# Altium PCB PCB.PcbDoc (part 1 of 2)
Units mm, origin at the board's own origin, x right, y up, seen from the top; angles counter-clockwise.
Board outline 100 x 70 mm, 4 copper layers (Top, Middle_1, Middle 2, Bot), stack 1.541 mm thick; 204 components, 143 nets, 825 pads, 208 vias.
Unrouted connection lines stored in the file: 379.
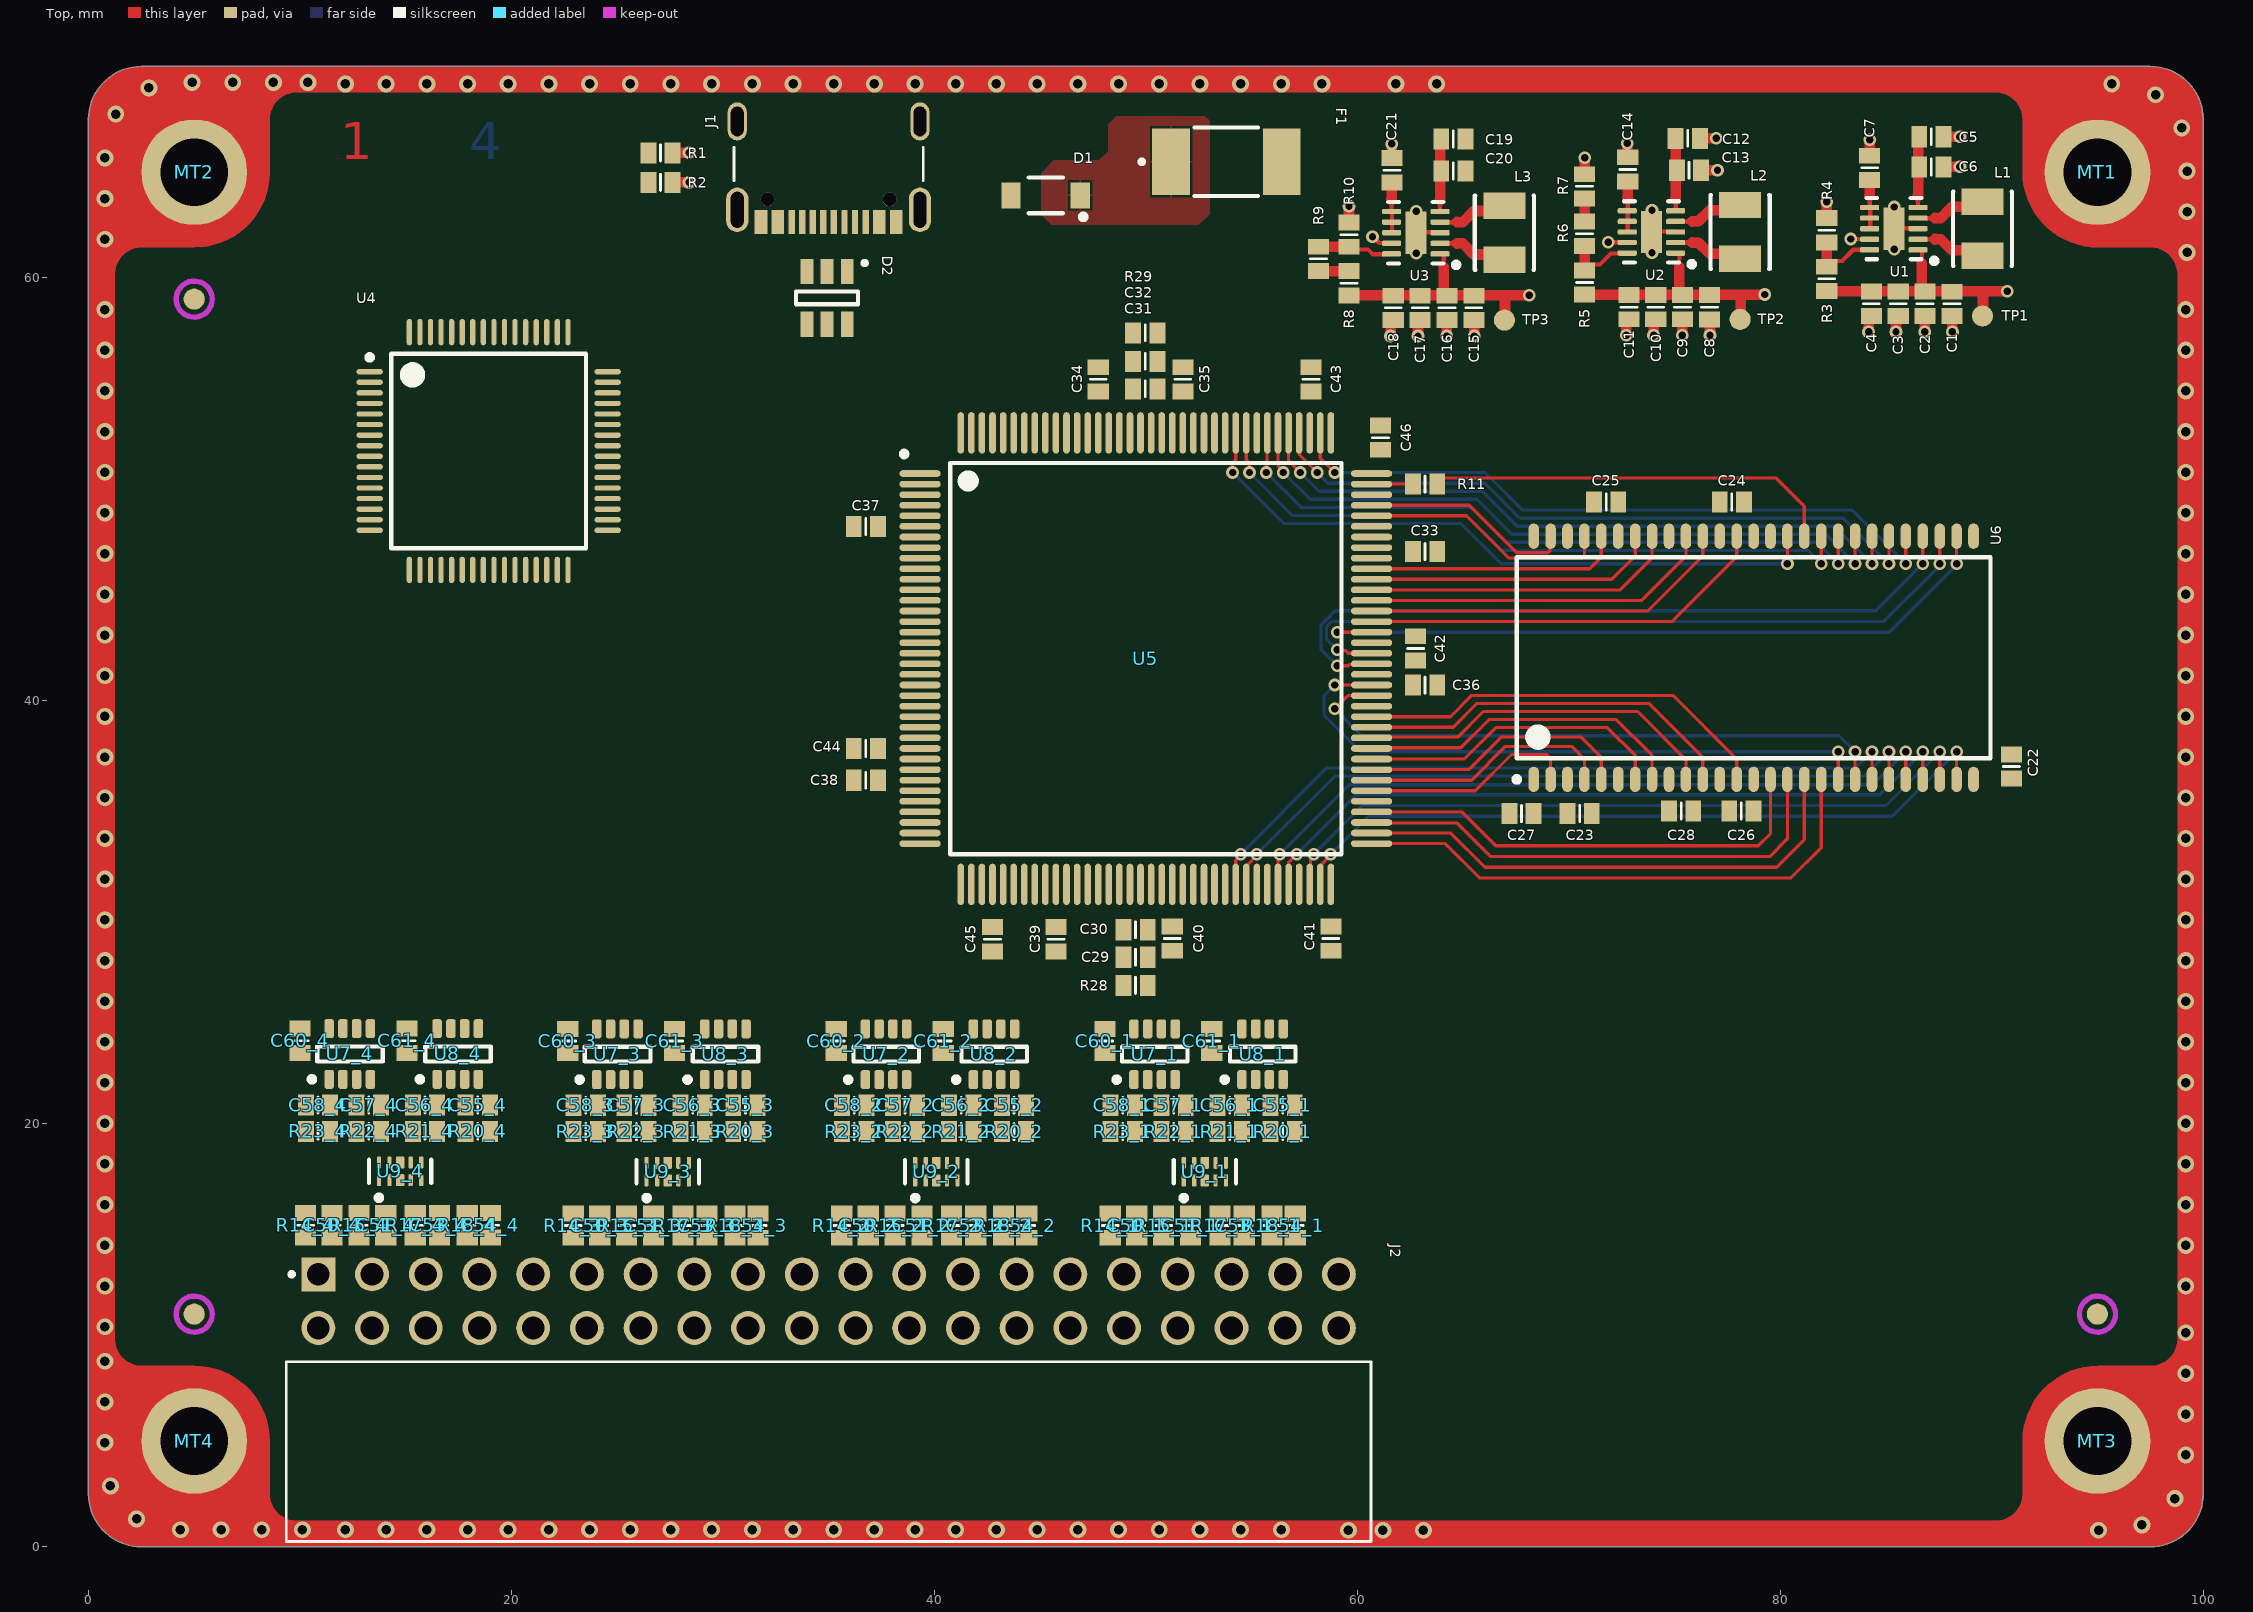
[diagram p0: Top view]
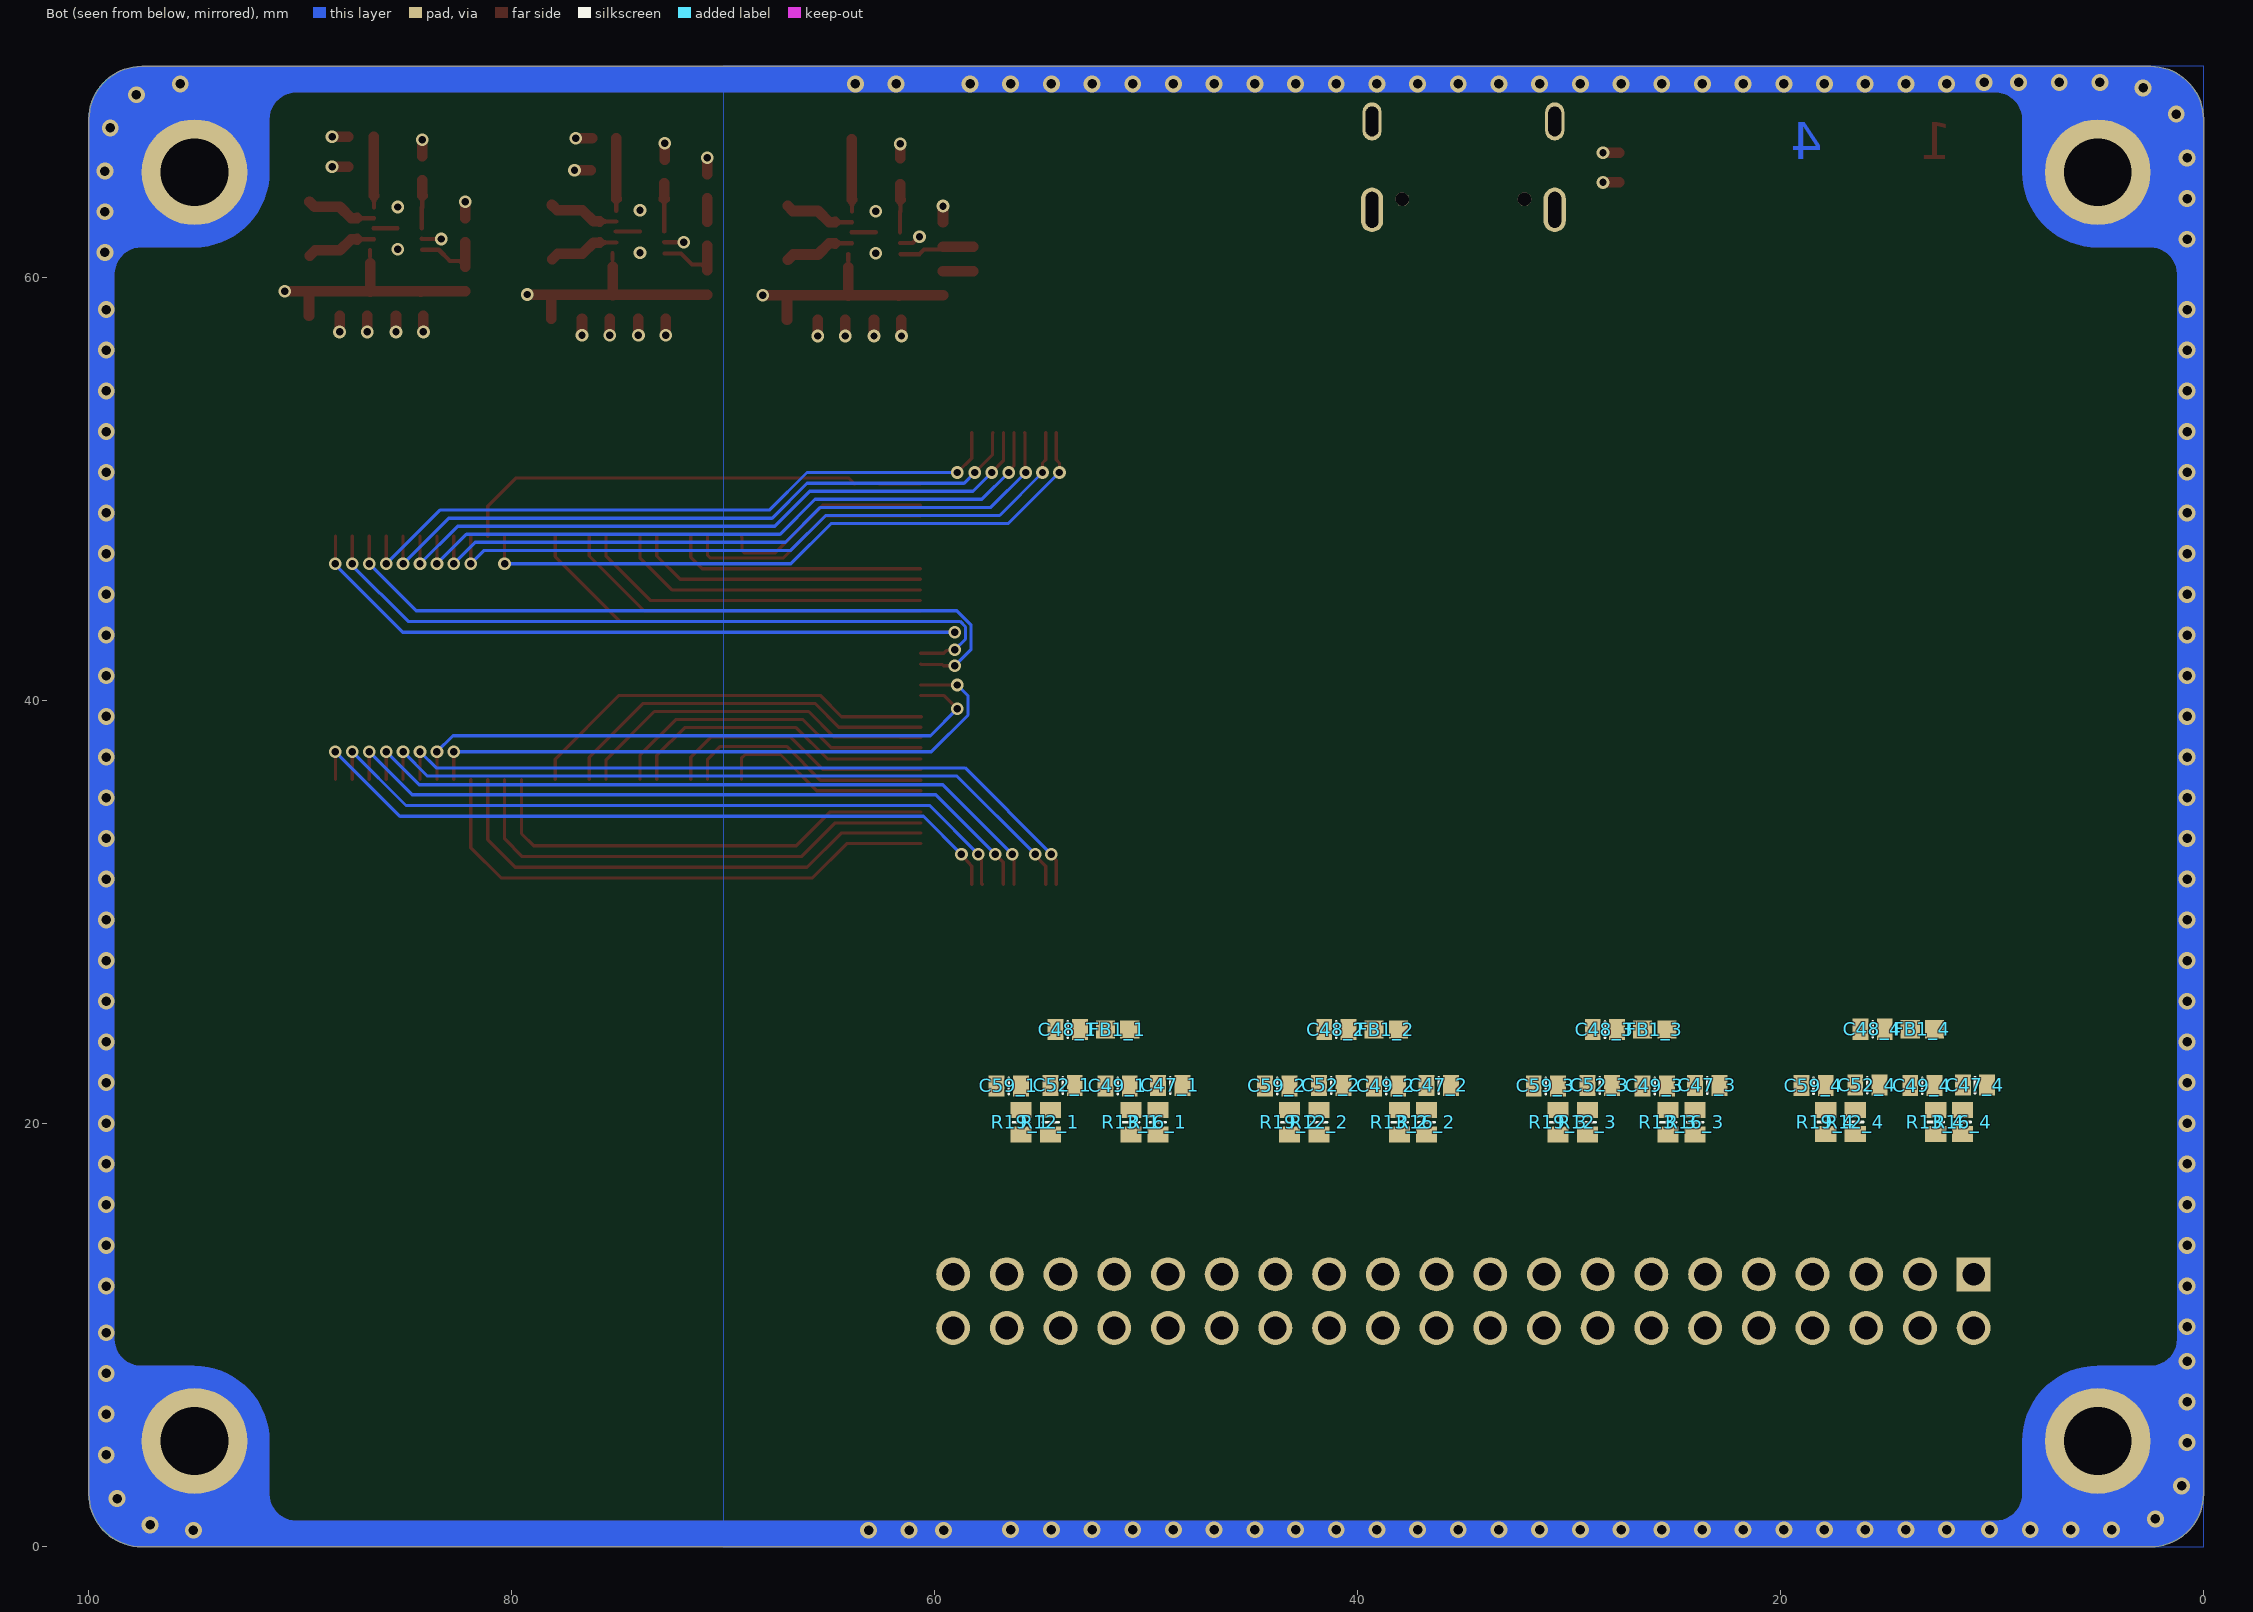
[diagram p1: Bot view, seen from below]
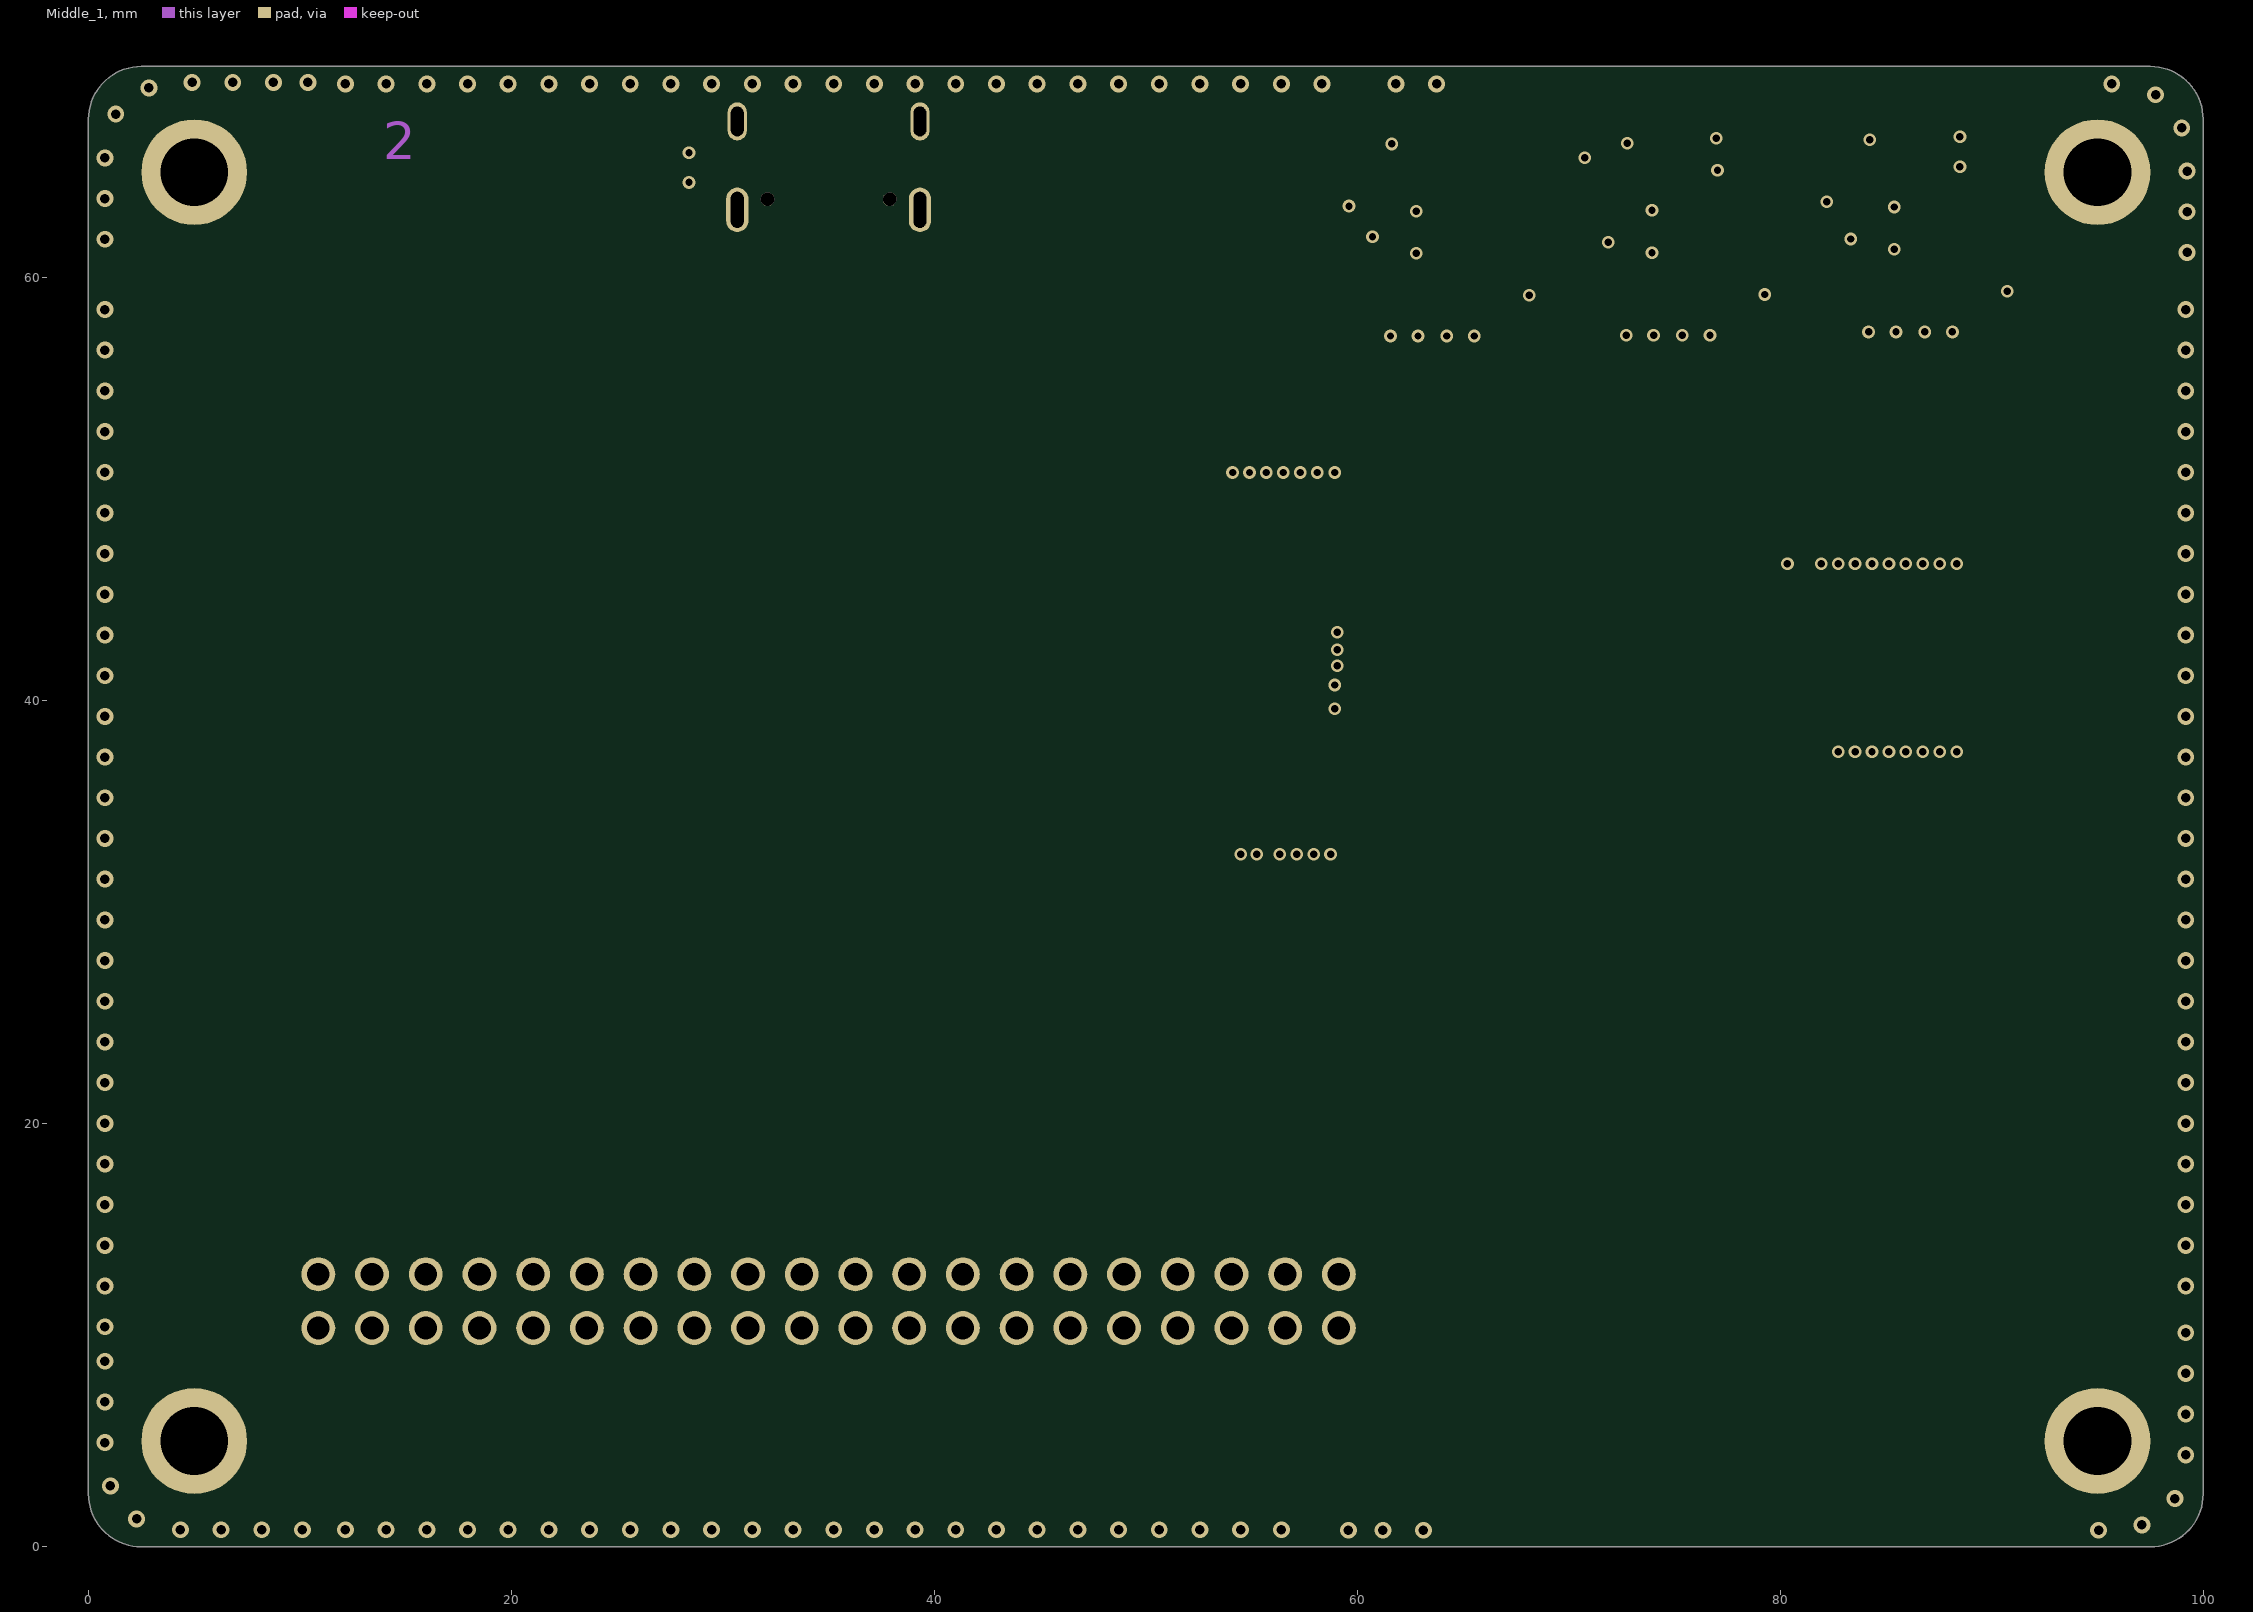
[diagram p2: Middle_1]
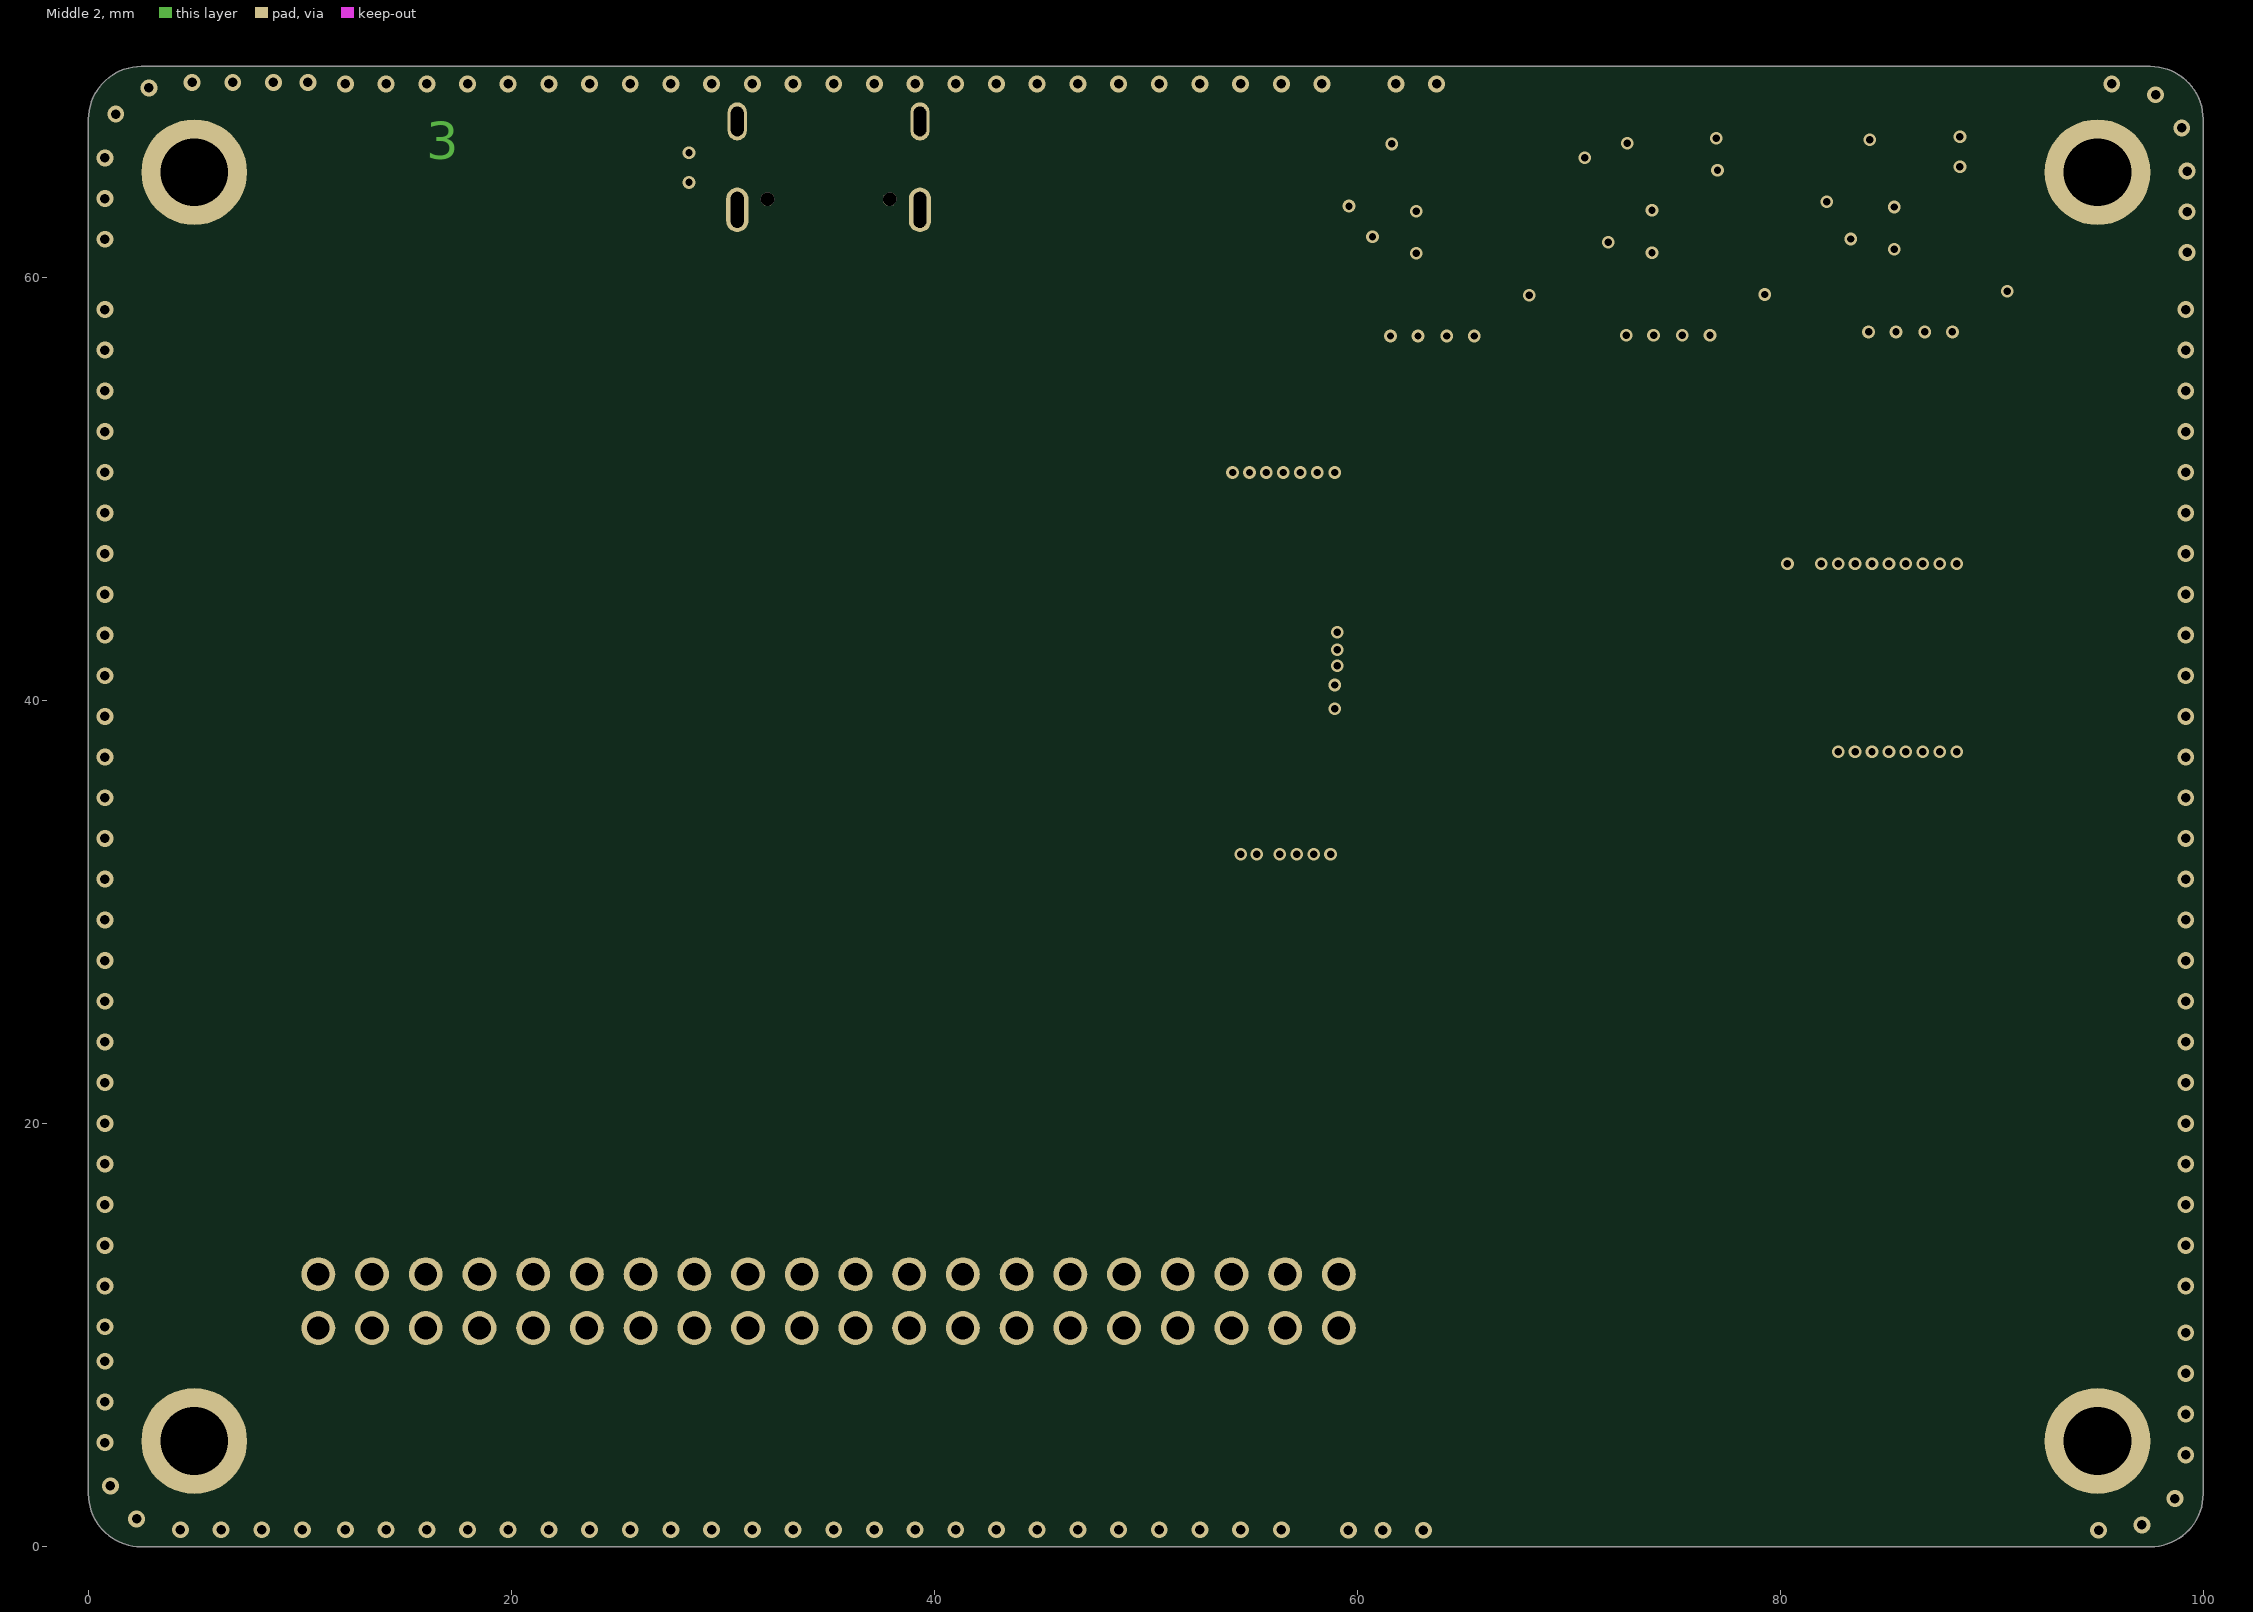
[diagram p3: Middle 2]

## Layer stack, top to bottom
Top Solder: solder mask 0.0127, Solder Resist, Dk 3.8
Top: signal copper 0.035
Dielectric 1: prepreg 0.1855, 7628, Dk 4.74
Middle_1: signal copper 0.035
Core: core 1.03, FR-4, Dk 4.6
Middle 2: signal copper 0.035
Dielectric 2: prepreg 0.1855, 7628, Dk 4.74
Bot: signal copper 0.035
Bottom Solder: solder mask 0.0127, Solder Resist, Dk 3.8

## Board outline
2.5,0 cw(c2.5,2.5) 0,2.5 0,67.5 cw(c2.5,67.5) 2.5,70 97.5,70 cw(c97.5,67.5) 100,67.5 100,2.5 cw(c97.5,2.5) 97.5,0

## Design rules (kind name [scope] priority, off if disabled: settings)
BoardOutlineClearance [All] p1: gap=0.2 ignorepadtopadclearanceinfootprint=FALSE
Clearance [All] p1: gap=0.102 ignorepadtopadclearanceinfootprint=FALSE except(0.1: SMDPad-Hole; 0.127: Arc-Via Track-Via SMDPad-Via THPad-Via Via-Via Via-Fill Via-Poly Via-Region Via-Text; 0.25: Arc-Hole Track-Hole THPad-Hole Via-Hole Fill-Hole Poly-Hole Region-Hole Text-Hole)
ComponentClearance [All] p1: gap=0.102 collisioncheckmode=3 verticalgap=0.102 showdistances=TRUE
DiffPairsRouting DiffPairsRouting_USB [InDifferentialPairClass('USB')] p1: maxlimit=0.254 minlimit=0.127 mostfreqgap=0.254 toplayer_maxgap=0.127 toplayer_prefgap=0.127 toplayer_minwidth=0.178 toplayer_maxwidth=0.178 toplayer_prefwidth=0.178 impedanceprofiledriven=TRUE impedanceprofileid={492B9CAE-2537-4936-96EE-43986F0FA2F4} impedanceprofilevalue=90.000000 maxuncoupledlength=12.7
DiffPairsRouting DiffPairsRouting_CAN [InDifferentialPairClass('CAN_BUS')] p2: maxlimit=0.254 minlimit=0.127 mostfreqgap=0.254 toplayer_maxgap=0.127 toplayer_prefgap=0.127 toplayer_minwidth=0.461 toplayer_maxwidth=0.461 toplayer_prefwidth=0.461 impedanceprofiledriven=TRUE impedanceprofileid={806E55BA-9264-46BE-8866-E8A3E6802D65} impedanceprofilevalue=60.000000 maxuncoupledlength=12.7
DiffPairsRouting [All] p3: maxlimit=0.102 minlimit=0.102 mostfreqgap=0.102 toplayer_minwidth=0.127 toplayer_maxwidth=1816.048 toplayer_prefwidth=0.2 midlayer1_minwidth=0.127 midlayer1_maxwidth=1816.048 midlayer1_prefwidth=0.2 midlayer2_minwidth=0.127 midlayer2_maxwidth=1816.048 midlayer2_prefwidth=0.2 bottomlayer_minwidth=0.127 bottomlayer_maxwidth=1816.048 bottomlayer_prefwidth=0.2 maxuncoupledlength=12.7
Height [All] p1: minheight=0 maxheight=1816.048 prefheight=12.7
HoleSize [All] p1: absolutevalues=TRUE maxlimit=6.3 minlimit=0.2 maxpercent=80.000 minpercent=20.000
HoleToHoleClearance [All] p1: gap=0.25 allowstackedmicrovias=FALSE
MinimumAnnularRing [All] p1: minimumring=0.076
MinimumSolderMaskSliver [All] p1: minsoldermaskwidth=0.22
PlaneClearance [All] p1: clearance=0.102
PlaneConnect PlaneConnectPowerPads [InPadClass('PowerPads')] p1: planeconnectstyle=Direct reliefexpansion=0.508 reliefentries=4 reliefconductorwidth=0.254 reliefairgap=0.254
PlaneConnect [All] p2: pad.planeconnectstyle=Relief pad.reliefexpansion=0.3 pad.reliefentries=4 pad.reliefconductorwidth=0.102 pad.reliefairgap=0.102 via.planeconnectstyle=Direct via.reliefexpansion=0.3 via.reliefentries=4 via.reliefconductorwidth=0.127 via.reliefairgap=0.127
PolygonConnect "Schematic Polygon Connect Style_7" [InComponent('MT1')] p1: connectstyle=Direct reliefconductorwidth=0.254 reliefentries=4 polygonreliefangle="90 Angle" airgapwidth=0.254
PolygonConnect "Schematic Polygon Connect Style_6" [InComponent('MT4')] p2: connectstyle=Direct reliefconductorwidth=0.254 reliefentries=4 polygonreliefangle="90 Angle" airgapwidth=0.254
PolygonConnect "Schematic Polygon Connect Style_5" [InComponent('MT2')] p3: connectstyle=Direct reliefconductorwidth=0.254 reliefentries=4 polygonreliefangle="90 Angle" airgapwidth=0.254
PolygonConnect "Schematic Polygon Connect Style_4" [InComponent('MT3')] p4: connectstyle=Direct reliefconductorwidth=0.254 reliefentries=4 polygonreliefangle="90 Angle" airgapwidth=0.254
PolygonConnect PolygonConnect_MOUNTING_PADS [InComponentClass('MOUNTING_PADS')] p5: connectstyle=Direct reliefconductorwidth=0.254 reliefentries=4 polygonreliefangle="90 Angle" airgapwidth=0.254
PolygonConnect [All] p6: thpad.connectstyle=Relief thpad.reliefconductorwidth=0.102 thpad.reliefentries=4 thpad.polygonreliefangle="90 Angle" thpad.airgapwidth=0.102 smdpad.connectstyle=Relief smdpad.reliefconductorwidth=0.102 smdpad.reliefentries=4 smdpad.polygonreliefangle="90 Angle" smdpad.airgapwidth=0.102 via.connectstyle=Direct via.reliefconductorwidth=0.102 via.reliefentries=4 via.polygonreliefangle="90 Angle" via.airgapwidth=0.102
RoutingVias [All] p1: holewidth=0.2 width=0.45 viastyle="Through Hole" minholewidth=0.2 minwidth=0.45 maxholewidth=6.3 maxwidth=6.55
SilkToSilkClearance [All] p1: silktosilkclearance=0
SilkToSolderMaskClearance [IsPad] p1: minsilkscreentomaskgap=0.102 clearancetoexposedcopper=TRUE
SolderMaskExpansion Via_SolderMaskExpansion [IsVia] p1: expansion=0.075 istentingtop=TRUE
SolderMaskExpansion [All] p2: expansion=0 istentingtop=FALSE
SupplyNets "Schematic Supply Nets_12" [InNet('3V3A_2')] p1: voltage=0.000
SupplyNets "Schematic Supply Nets_11" [InNet('3V3A_1')] p2: voltage=0.000
SupplyNets "Schematic Supply Nets_10" [InNet('3V3A_4')] p3: voltage=0.000
SupplyNets "Schematic Supply Nets_9" [InNet('GND_PLL1')] p4: voltage=0.000
SupplyNets "Schematic Supply Nets_8" [InNet('3V3A_3')] p5: voltage=0.000
SupplyNets "Schematic Supply Nets_7" [InNet('GND_PLL0')] p6: voltage=0.000
SupplyNets "Schematic Supply Nets" [InNet('USB1_VBUS_FUSE')] p7: voltage=0.000
SupplyNets "Schematic Supply Nets_6" [InNet('VIN_5V0')] p8: voltage=0.000
SupplyNets "Schematic Supply Nets_5" [InNet('1V2')] p9: voltage=0.000
SupplyNets "Schematic Supply Nets_4" [InNet('3V3')] p10: voltage=0.000
SupplyNets "Schematic Supply Nets_3" [InNet('2V5')] p11: voltage=0.000
SupplyNets "Schematic Supply Nets_2" [InNet('GND')] p12: voltage=0.000
SupplyNets "Schematic Supply Nets_1" [InNet('USB1_VBUS')] p13: voltage=0.000
Width "50 Ohms" [InNetClass('50 Ohms')] p1: maxlimit=0.172 minlimit=0.137 preferedwidth=0.172 toplayer_minwidth=0.172 bottomlayer_minwidth=0.172 minimp=50.000000 maximp=50.000000 favimp=50.000000
Width Minimal [Not InAnyDifferentialPair] p2: maxlimit=1816.048 minlimit=0.152 preferedwidth=0.2 midlayer1_minwidth=0.2 midlayer2_minwidth=0.2 minimp=50.000000 maximp=50.000000 favimp=50.000000
20 further rules are at their usual default settings.

## Classes and differential pairs
net class SDRAM_DATA: SDRAM_DQ0 SDRAM_DQ1 SDRAM_DQ2 SDRAM_DQ3 SDRAM_DQ4 SDRAM_DQ5 SDRAM_DQ6 SDRAM_DQ7 SDRAM_DQ8 SDRAM_DQ9 SDRAM_DQ10 SDRAM_DQ11 SDRAM_DQ12 SDRAM_DQ13 SDRAM_DQ14 SDRAM_DQ15
channel class Input_Comparator_Frontend: U_Input_Frontend1 U_Input_Frontend2 U_Input_Frontend3 U_Input_Frontend4
component class U_Input_Frontend4: C47_4 C48_4 C49_4 C50_4 C51_4 C52_4 C53_4 C54_4 C55_4 C56_4 C57_4 C58_4 C59_4 C60_4 C61_4 FB1_4 R12_4 R13_4 R14_4 R15_4 R16_4 R17_4 R18_4 R19_4 R20_4 R21_4 R22_4 R23_4 U7_4 U8_4 U9_4
component class U_Input_Frontend3: C47_3 C48_3 C49_3 C50_3 C51_3 C52_3 C53_3 C54_3 C55_3 C56_3 C57_3 C58_3 C59_3 C60_3 C61_3 FB1_3 R12_3 R13_3 R14_3 R15_3 R16_3 R17_3 R18_3 R19_3 R20_3 R21_3 R22_3 R23_3 U7_3 U8_3 U9_3
component class U_Input_Frontend2: C47_2 C48_2 C49_2 C50_2 C51_2 C52_2 C53_2 C54_2 C55_2 C56_2 C57_2 C58_2 C59_2 C60_2 C61_2 FB1_2 R12_2 R13_2 R14_2 R15_2 R16_2 R17_2 R18_2 R19_2 R20_2 R21_2 R22_2 R23_2 U7_2 U8_2 U9_2
component class U_Input_Frontend1: C47_1 C48_1 C49_1 C50_1 C51_1 C52_1 C53_1 C54_1 C55_1 C56_1 C57_1 C58_1 C59_1 C60_1 C61_1 FB1_1 R12_1 R13_1 R14_1 R15_1 R16_1 R17_1 R18_1 R19_1 R20_1 R21_1 R22_1 R23_1 U7_1 U8_1 U9_1
net class SDRAM_ADDR: SDRAM_#CAS SDRAM_#CS SDRAM_#RAS SDRAM_#WE SDRAM_ADDR0 SDRAM_ADDR1 SDRAM_ADDR2 SDRAM_ADDR3 SDRAM_ADDR4 SDRAM_ADDR5 SDRAM_ADDR6 SDRAM_ADDR7 SDRAM_ADDR8 SDRAM_ADDR9 SDRAM_ADDR10 SDRAM_ADDR11 SDRAM_ADDR12 SDRAM_ADDR13 SDRAM_ADDR14 SDRAM_ADDR15 SDRAM_BS0 SDRAM_BS1 SDRAM_CKE SDRAM_CLK SDRAM_CLK_TERM SDRAM_LDQM SDRAM_UDQM
net class SDRAM_DQ[0..15]: SDRAM_DQ0 SDRAM_DQ1 SDRAM_DQ2 SDRAM_DQ3 SDRAM_DQ4 SDRAM_DQ5 SDRAM_DQ6 SDRAM_DQ7 SDRAM_DQ8 SDRAM_DQ9 SDRAM_DQ10 SDRAM_DQ11 SDRAM_DQ12 SDRAM_DQ13 SDRAM_DQ14 SDRAM_DQ15
net class SDRAM_ADDR[0..15]: SDRAM_ADDR0 SDRAM_ADDR1 SDRAM_ADDR2 SDRAM_ADDR3 SDRAM_ADDR4 SDRAM_ADDR5 SDRAM_ADDR6 SDRAM_ADDR7 SDRAM_ADDR8 SDRAM_ADDR9 SDRAM_ADDR10 SDRAM_ADDR11 SDRAM_ADDR12 SDRAM_ADDR13 SDRAM_ADDR14 SDRAM_ADDR15
component class U_JEDEC_TSSOP54_SDRAM: C22 C23 C24 C25 C26 C27 C28 R11 U6
component class U_FT2232H_USB_Converter: U4
component class Nyquist_LA_Top: MT1 MT2 MT3 MT4
component class U_Probe_Connectors: J2
component class U_USB_Input: D1 D2 F1 J1 R1 R2
component class U_Power_Supply: C1 C2 C3 C4 C5 C6 C7 C8 C9 C10 C11 C12 C13 C14 C15 C16 C17 C18 C19 C20 C21 L1 L2 L3 R3 R4 R5 R6 R7 R8 R9 R10 TP1 TP2 TP3 U1 U2 U3
component class U_FPGA_iCE40HX4K: C29 C30 C31 C32 C33 C34 C35 C36 C37 C38 C39 C40 C41 C42 C43 C44 C45 C46 R28 R29 U5

## Components (designator, comment, footprint, x,y, rotation, side; value= is the part's Value field where it differs from the comment)
C1 "4.7uF 35V" "CAPC1607X09L - 0603" 88.118,58.774 r90 top value=4u7
C2 "4.7uF 35V" "CAPC1607X09L - 0603" 86.848,58.777 r90 top value=4u7
C3 "4.7uF 35V" "CAPC1607X09L - 0603" 85.578,58.777 r90 top value=4u7
C4 "4.7uF 35V" "CAPC1607X09L - 0603" 84.308,58.777 r90 top value=4u7
C5 "4.7uF 35V" "CAPC1607X09L - 0603" 87.149,66.676 r180 top value=4u7
C6 "4.7uF 35V" "CAPC1607X09L - 0603" 87.149,65.251 r180 top value=4u7
C7 "100nF 50V" "CAPC1607X09L - 0603" 84.229,65.204 r270 top value=100n
C8 "4.7uF 35V" "CAPC1607X09L - 0603" 76.654,58.618 r90 top value=4u7
C9 "4.7uF 35V" "CAPC1607X09L - 0603" 75.384,58.621 r90 top value=4u7
C10 "4.7uF 35V" "CAPC1607X09L - 0603" 74.114,58.621 r90 top value=4u7
C11 "4.7uF 35V" "CAPC1607X09L - 0603" 72.844,58.621 r90 top value=4u7
C12 "4.7uF 35V" "CAPC1607X09L - 0603" 75.63,66.602 r180 top value=4u7
C13 "4.7uF 35V" "CAPC1607X09L - 0603" 75.685,65.095 r180 top value=4u7
C14 "100nF 50V" "CAPC1607X09L - 0603" 72.789,65.13 r270 top value=100n
C15 "4.7uF 35V" "CAPC1607X09L - 0603" 65.512,58.582 r90 top value=4u7
C16 "4.7uF 35V" "CAPC1607X09L - 0603" 64.242,58.585 r90 top value=4u7
C17 "4.7uF 35V" "CAPC1607X09L - 0603" 62.972,58.585 r90 top value=4u7
C18 "4.7uF 35V" "CAPC1607X09L - 0603" 61.702,58.585 r90 top value=4u7
C19 "4.7uF 35V" "CAPC1607X09L - 0603" 64.543,66.566 r180 top value=4u7
C20 "4.7uF 35V" "CAPC1607X09L - 0603" 64.543,65.059 r180 top value=4u7
C21 "100nF 50V" "CAPC1607X09L - 0603" 61.647,65.094 r270 top value=100n
C22 "100nF 50V" "CAPC1607X09L - 0603" 90.932,36.897 r270 top value=100n
C23 "100nF 50V" "CAPC1607X09L - 0603" 70.515,34.673 r180 top value=100n
C24 "100nF 50V" "CAPC1607X09L - 0603" 77.715,49.403 r180 top value=100n
C25 "100nF 50V" "CAPC1607X09L - 0603" 71.765,49.403 r0 top value=100n
C26 "100nF 50V" "CAPC1607X09L - 0603" 78.165,34.798 r0 top value=100n
C27 "100nF 50V" "CAPC1607X09L - 0603" 67.765,34.673 r0 top value=100n
C28 "100nF 50V" "CAPC1607X09L - 0603" 75.315,34.798 r180 top value=100n
C29 "4.7uF 35V" "CAPC1607X09L - 0603" 49.514,27.88 r0 top value=4u7
C30 "100nF 50V" "CAPC1607X09L - 0603" 49.514,29.18 r0 top value=100n
C31 "4.7uF 35V" "CAPC1607X09L - 0603" 49.971,54.755 r0 top value=4u7
C32 "100nF 50V" "CAPC1607X09L - 0603" 49.971,56.055 r0 top value=100n
C33 "100nF 50V" "CAPC1607X09L - 0603" 63.205,47.06 r180 top value=100n
C34 "100nF 50V" "CAPC1607X09L - 0603" 47.747,55.205 r270 top value=100n
C35 "100nF 50V" "CAPC1607X09L - 0603" 51.75,55.205 r270 top value=100n
C36 "100nF 50V" "CAPC1607X09L - 0603" 63.205,40.75 r180 top value=100n
C37 "100nF 50V" "CAPC1607X09L - 0603" 36.763,48.25 r0 top value=100n
C38 "100nF 50V" "CAPC1607X09L - 0603" 36.763,36.25 r0 top value=100n
C39 "100nF 50V" "CAPC1607X09L - 0603" 45.75,28.73 r90 top value=100n
C40 "100nF 50V" "CAPC1607X09L - 0603" 51.25,28.762 r90 top value=100n
C41 "100nF 50V" "CAPC1607X09L - 0603" 58.75,28.762 r90 top value=100n
C42 "100nF 50V" "CAPC1607X09L - 0603" 62.755,42.478 r90 top value=100n
C43 "100nF 50V" "CAPC1607X09L - 0603" 57.816,55.205 r270 top value=100n
C44 "100nF 50V" "CAPC1607X09L - 0603" 36.763,37.75 r0 top value=100n
C45 "100nF 50V" "CAPC1607X09L - 0603" 42.749,28.73 r90 top value=100n
C46 "100nF 50V" "CAPC1607X09L - 0603" 61.102,52.451 r270 top value=100n
C47_1 "10nF 100V" "CAPC1607X09L - 0603" 48.864,21.816 r0 bottom value=10n (schematic designator C47)
C47_2 "10nF 100V" "CAPC1607X09L - 0603" 36.164,21.816 r0 bottom value=10n (schematic designator C47)
C47_3 "10nF 100V" "CAPC1607X09L - 0603" 23.464,21.816 r0 bottom value=10n (schematic designator C47)
C47_4 "10nF 100V" "CAPC1607X09L - 0603" 10.807,21.828 r0 bottom value=10n (schematic designator C47)
C48_1 "100nF 50V" "CAPC1607X09L - 0603" 53.705,24.459 r180 bottom value=100n (schematic designator C48)
C48_2 "100nF 50V" "CAPC1607X09L - 0603" 41.005,24.459 r180 bottom value=100n (schematic designator C48)
C48_3 "100nF 50V" "CAPC1607X09L - 0603" 28.305,24.459 r180 bottom value=100n (schematic designator C48)
C48_4 "100nF 50V" "CAPC1607X09L - 0603" 15.648,24.471 r180 bottom value=100n (schematic designator C48)
C49_1 "10nF 100V" "CAPC1607X09L - 0603" 51.352,21.792 r180 bottom value=10n (schematic designator C49)
C49_2 "10nF 100V" "CAPC1607X09L - 0603" 38.652,21.792 r180 bottom value=10n (schematic designator C49)
C49_3 "10nF 100V" "CAPC1607X09L - 0603" 25.952,21.792 r180 bottom value=10n (schematic designator C49)
C49_4 "10nF 100V" "CAPC1607X09L - 0603" 13.295,21.804 r180 bottom value=10n (schematic designator C49)
C50_1 "10pF 100V" "CAPC1607X09L - 0603" 49.574,15.188 r90 top value=10p (schematic designator C50)
C50_2 "10pF 100V" "CAPC1607X09L - 0603" 36.874,15.188 r90 top value=10p (schematic designator C50)
C50_3 "10pF 100V" "CAPC1607X09L - 0603" 24.174,15.188 r90 top value=10p (schematic designator C50)
C50_4 "10pF 100V" "CAPC1607X09L - 0603" 11.517,15.2 r90 top value=10p (schematic designator C50)
C51_1 "10pF 100V" "CAPC1607X09L - 0603" 52.114,15.188 r90 top value=10p (schematic designator C51)
C51_2 "10pF 100V" "CAPC1607X09L - 0603" 39.414,15.188 r90 top value=10p (schematic designator C51)
C51_3 "10pF 100V" "CAPC1607X09L - 0603" 26.714,15.188 r90 top value=10p (schematic designator C51)
C51_4 "10pF 100V" "CAPC1607X09L - 0603" 14.057,15.2 r90 top value=10p (schematic designator C51)
C52_1 "10nF 100V" "CAPC1607X09L - 0603" 53.952,21.816 r0 bottom value=10n (schematic designator C52)
C52_2 "10nF 100V" "CAPC1607X09L - 0603" 41.252,21.816 r0 bottom value=10n (schematic designator C52)
C52_3 "10nF 100V" "CAPC1607X09L - 0603" 28.552,21.816 r0 bottom value=10n (schematic designator C52)
C52_4 "10nF 100V" "CAPC1607X09L - 0603" 15.895,21.828 r0 bottom value=10n (schematic designator C52)
C53_1 "10pF 100V" "CAPC1607X09L - 0603" 54.654,15.188 r90 top value=10p (schematic designator C53)
C53_2 "10pF 100V" "CAPC1607X09L - 0603" 41.954,15.188 r90 top value=10p (schematic designator C53)
C53_3 "10pF 100V" "CAPC1607X09L - 0603" 29.254,15.188 r90 top value=10p (schematic designator C53)
C53_4 "10pF 100V" "CAPC1607X09L - 0603" 16.597,15.2 r90 top value=10p (schematic designator C53)
C54_1 "10pF 100V" "CAPC1607X09L - 0603" 57.067,15.188 r90 top value=10p (schematic designator C54)
C54_2 "10pF 100V" "CAPC1607X09L - 0603" 44.367,15.188 r90 top value=10p (schematic designator C54)
C54_3 "10pF 100V" "CAPC1607X09L - 0603" 31.667,15.188 r90 top value=10p (schematic designator C54)
C54_4 "10pF 100V" "CAPC1607X09L - 0603" 19.01,15.2 r90 top value=10p (schematic designator C54)
C55_1 "5pF 100V" "CAPC1607X09L - 0603" 56.467,20.878 r180 top value=5p (schematic designator C55)
C55_2 "5pF 100V" "CAPC1607X09L - 0603" 43.767,20.878 r180 top value=5p (schematic designator C55)
C55_3 "5pF 100V" "CAPC1607X09L - 0603" 31.067,20.878 r180 top value=5p (schematic designator C55)
C55_4 "5pF 100V" "CAPC1607X09L - 0603" 18.41,20.89 r180 top value=5p (schematic designator C55)
C56_1 "5pF 100V" "CAPC1607X09L - 0603" 53.97,20.878 r0 top value=5p (schematic designator C56)
C56_2 "5pF 100V" "CAPC1607X09L - 0603" 41.27,20.878 r0 top value=5p (schematic designator C56)
C56_3 "5pF 100V" "CAPC1607X09L - 0603" 28.57,20.878 r0 top value=5p (schematic designator C56)
C56_4 "5pF 100V" "CAPC1607X09L - 0603" 15.913,20.89 r0 top value=5p (schematic designator C56)
C57_1 "5pF 100V" "CAPC1607X09L - 0603" 51.314,20.878 r180 top value=5p (schematic designator C57)
C57_2 "5pF 100V" "CAPC1607X09L - 0603" 38.614,20.878 r180 top value=5p (schematic designator C57)
C57_3 "5pF 100V" "CAPC1607X09L - 0603" 25.914,20.878 r180 top value=5p (schematic designator C57)
C57_4 "5pF 100V" "CAPC1607X09L - 0603" 13.257,20.89 r180 top value=5p (schematic designator C57)
C58_1 "5pF 100V" "CAPC1607X09L - 0603" 48.912,20.878 r0 top value=5p (schematic designator C58)
C58_2 "5pF 100V" "CAPC1607X09L - 0603" 36.212,20.878 r0 top value=5p (schematic designator C58)
C58_3 "5pF 100V" "CAPC1607X09L - 0603" 23.512,20.878 r0 top value=5p (schematic designator C58)
C58_4 "5pF 100V" "CAPC1607X09L - 0603" 10.855,20.89 r0 top value=5p (schematic designator C58)
C59_1 "10nF 100V" "CAPC1607X09L - 0603" 56.499,21.792 r180 bottom value=10n (schematic designator C59)
C59_2 "10nF 100V" "CAPC1607X09L - 0603" 43.799,21.792 r180 bottom value=10n (schematic designator C59)
C59_3 "10nF 100V" "CAPC1607X09L - 0603" 31.099,21.792 r180 bottom value=10n (schematic designator C59)
C59_4 "10nF 100V" "CAPC1607X09L - 0603" 18.442,21.804 r180 bottom value=10n (schematic designator C59)
C60_1 "100nF 50V" "CAPC1607X09L - 0603" 48.062,23.916 r90 top value=100n (schematic designator C60)
C60_2 "100nF 50V" "CAPC1607X09L - 0603" 35.362,23.916 r90 top value=100n (schematic designator C60)
C60_3 "100nF 50V" "CAPC1607X09L - 0603" 22.662,23.916 r90 top value=100n (schematic designator C60)
C60_4 "100nF 50V" "CAPC1607X09L - 0603" 10.005,23.928 r90 top value=100n (schematic designator C60)
C61_1 "100nF 50V" "CAPC1607X09L - 0603" 53.12,23.916 r90 top value=100n (schematic designator C61)
C61_2 "100nF 50V" "CAPC1607X09L - 0603" 40.42,23.916 r90 top value=100n (schematic designator C61)
C61_3 "100nF 50V" "CAPC1607X09L - 0603" 27.72,23.916 r90 top value=100n (schematic designator C61)
C61_4 "100nF 50V" "CAPC1607X09L - 0603" 15.063,23.928 r90 top value=100n (schematic designator C61)
D1 "Schottky 60V 1A" "SOD123 - Nexperia" 45.265,63.905 r180 top
D2 "USB ESD" SOT95P280X145-6N 34.925,59.055 r270 top
F1 "PTC 1.1A" LF_1812L010DR 53.808,65.492 r0 top
FB1_1 "Ferrite 120R" "muRata 0603 Ferrite Bead" 51.351,24.459 r0 bottom (schematic designator FB1)
FB1_2 "Ferrite 120R" "muRata 0603 Ferrite Bead" 38.651,24.459 r0 bottom (schematic designator FB1)
FB1_3 "Ferrite 120R" "muRata 0603 Ferrite Bead" 25.951,24.459 r0 bottom (schematic designator FB1)
FB1_4 "Ferrite 120R" "muRata 0603 Ferrite Bead" 13.294,24.471 r0 bottom (schematic designator FB1)
J1 "USB-C" AMPHENOL_12402012E212A 35,67.4 r180 top locked
J2 "Header 2x20 90deg" SULLINS_PPPC202LJBN-RC 35,4.495 r0 top locked
L1 "1.5uH 1.75A" LQH32PB_N0-MFG 89.565,62.33 r270 top value=1u5
L2 "1.5uH 1.75A" LQH32PB_N0-MFG 78.101,62.174 r270 top value=1u5
L3 "1.5uH 1.75A" LQH32PB_N0-MFG 66.959,62.138 r270 top value=1u5
MT1 "PTH-M3D5X5" M3_Mounting_Circular_Screw_L8mm 95,65 r0 top
MT2 "PTH-M3D5X5" M3_Mounting_Circular_Screw_L8mm 5,65 r0 top
MT3 "PTH-M3D5X5" M3_Mounting_Circular_Screw_L8mm 95,5 r0 top
MT4 "PTH-M3D5X5" M3_Mounting_Circular_Screw_L8mm 5,5 r0 top
R1 "5.1k" "RESC1508X05L - 0603" 27.051,65.913 r180 top value=5k1
R2 "5.1k" "RESC1508X05L - 0603" 27.051,64.516 r180 top value=5k1
R3 "560k" "RESC1508X05L - 0603" 82.199,59.955 r270 top
R4 "100k" "RESC1508X05L - 0603" 82.199,62.257 r270 top
R5 "560k" "RESC1508X05L - 0603" 70.749,59.785 r270 top
R6 "43.2k" "RESC1508X05L - 0603" 70.749,62.087 r90 top value=43k2
R7 "100k" "RESC1508X05L - 0603" 70.749,64.33 r270 top
R8 "100k" "RESC1508X05L - 0603" 59.607,59.749 r270 top
R9 "43.2k" "RESC1508X05L - 0603" 58.17,60.899 r90 top value=43k2
R10 "100k" "RESC1508X05L - 0603" 59.607,62.049 r270 top
R11 "20R" "RESC1508X05L - 0603" 63.205,50.25 r0 top
R12_1 "100R" "RESC1508X05L - 0603" 54.527,20.074 r90 bottom (schematic designator R12)
R12_2 "100R" "RESC1508X05L - 0603" 41.827,20.074 r90 bottom (schematic designator R12)
R12_3 "100R" "RESC1508X05L - 0603" 29.127,20.074 r90 bottom (schematic designator R12)
R12_4 "100R" "RESC1508X05L - 0603" 16.47,20.086 r90 bottom (schematic designator R12)
R13_1 "100R" "RESC1508X05L - 0603" 50.717,20.074 r90 bottom (schematic designator R13)
R13_2 "100R" "RESC1508X05L - 0603" 38.017,20.074 r90 bottom (schematic designator R13)
R13_3 "100R" "RESC1508X05L - 0603" 25.317,20.074 r90 bottom (schematic designator R13)
R13_4 "100R" "RESC1508X05L - 0603" 12.66,20.086 r90 bottom (schematic designator R13)
R14_1 "100k" "RESC1508X05L - 0603" 48.321,15.188 r90 top (schematic designator R14)
R14_2 "100k" "RESC1508X05L - 0603" 35.621,15.188 r90 top (schematic designator R14)
R14_3 "100k" "RESC1508X05L - 0603" 22.921,15.188 r90 top (schematic designator R14)
R14_4 "100k" "RESC1508X05L - 0603" 10.264,15.2 r90 top (schematic designator R14)
R15_1 "100k" "RESC1508X05L - 0603" 50.844,15.188 r90 top (schematic designator R15)
R15_2 "100k" "RESC1508X05L - 0603" 38.144,15.188 r90 top (schematic designator R15)
R15_3 "100k" "RESC1508X05L - 0603" 25.444,15.188 r90 top (schematic designator R15)
R15_4 "100k" "RESC1508X05L - 0603" 12.787,15.2 r90 top (schematic designator R15)
R16_1 "100R" "RESC1508X05L - 0603" 49.447,20.074 r90 bottom (schematic designator R16)
R16_2 "100R" "RESC1508X05L - 0603" 36.747,20.074 r90 bottom (schematic designator R16)
R16_3 "100R" "RESC1508X05L - 0603" 24.047,20.074 r90 bottom (schematic designator R16)
R16_4 "100R" "RESC1508X05L - 0603" 11.39,20.086 r90 bottom (schematic designator R16)
R17_1 "100k" "RESC1508X05L - 0603" 53.511,15.188 r90 top (schematic designator R17)
R17_2 "100k" "RESC1508X05L - 0603" 40.811,15.188 r90 top (schematic designator R17)
R17_3 "100k" "RESC1508X05L - 0603" 28.111,15.188 r90 top (schematic designator R17)
R17_4 "100k" "RESC1508X05L - 0603" 15.454,15.2 r90 top (schematic designator R17)
R18_1 "100k" "RESC1508X05L - 0603" 55.966,15.188 r90 top (schematic designator R18)
R18_2 "100k" "RESC1508X05L - 0603" 43.266,15.188 r90 top (schematic designator R18)
R18_3 "100k" "RESC1508X05L - 0603" 30.566,15.188 r90 top (schematic designator R18)
R18_4 "100k" "RESC1508X05L - 0603" 17.908,15.2 r90 top (schematic designator R18)
R19_1 "100R" "RESC1508X05L - 0603" 55.924,20.074 r90 bottom (schematic designator R19)
R19_2 "100R" "RESC1508X05L - 0603" 43.224,20.074 r90 bottom (schematic designator R19)
R19_3 "100R" "RESC1508X05L - 0603" 30.524,20.074 r90 bottom (schematic designator R19)
R19_4 "100R" "RESC1508X05L - 0603" 17.867,20.086 r90 bottom (schematic designator R19)
R20_1 "100k" "RESC1508X05L - 0603" 56.467,19.633 r180 top (schematic designator R20)
R20_2 "100k" "RESC1508X05L - 0603" 43.767,19.633 r180 top (schematic designator R20)
R20_3 "100k" "RESC1508X05L - 0603" 31.067,19.633 r180 top (schematic designator R20)
R20_4 "100k" "RESC1508X05L - 0603" 18.41,19.645 r180 top (schematic designator R20)
R21_1 "100k" "RESC1508X05L - 0603" 53.97,19.633 r0 top (schematic designator R21)
R21_2 "100k" "RESC1508X05L - 0603" 41.27,19.633 r0 top (schematic designator R21)
R21_3 "100k" "RESC1508X05L - 0603" 28.57,19.633 r0 top (schematic designator R21)
R21_4 "100k" "RESC1508X05L - 0603" 15.913,19.645 r0 top (schematic designator R21)
R22_1 "100k" "RESC1508X05L - 0603" 51.314,19.633 r180 top (schematic designator R22)
R22_2 "100k" "RESC1508X05L - 0603" 38.614,19.633 r180 top (schematic designator R22)
R22_3 "100k" "RESC1508X05L - 0603" 25.914,19.633 r180 top (schematic designator R22)
R22_4 "100k" "RESC1508X05L - 0603" 13.257,19.645 r180 top (schematic designator R22)
R23_1 "100k" "RESC1508X05L - 0603" 48.912,19.633 r0 top (schematic designator R23)
R23_2 "100k" "RESC1508X05L - 0603" 36.212,19.633 r0 top (schematic designator R23)
R23_3 "100k" "RESC1508X05L - 0603" 23.512,19.633 r0 top (schematic designator R23)
R23_4 "100k" "RESC1508X05L - 0603" 10.855,19.645 r0 top (schematic designator R23)
R28 "100R" "RESC1508X05L - 0603" 49.514,26.543 r0 top
R29 "100R" "RESC1508X05L - 0603" 49.971,57.404 r0 top
TP1 "Test Point" TP_CIRC_SMD_1mm 89.565,58.199 r270 top
TP2 "Test Point" TP_CIRC_SMD_1mm 78.101,58.043 r270 top
TP3 "Test Point" TP_CIRC_SMD_1mm 66.959,58.007 r270 top
U1 "Adjustable Buck-boost converter" SON10_2.5x2.5_GEN 85.374,62.33 r180 top
U2 "Adjustable Buck-boost converter" SON10_2.5x2.5_GEN 73.91,62.174 r180 top
U3 "Adjustable Buck-boost converter" SON10_2.5x2.5_GEN 62.768,62.138 r180 top
U4 "FTDI High-Speed USB FT2232HL" LQFP64_FTDI 18.923,51.816 r0 top
U5 "FPGA Lattice iCE40HX4K" LQFP144_LATTICE 50,42 r0 top
U6 "256Mb SDRAM 166MHz" TSSOP54_GEN 78.74,42.037 r90 top
U7_1 "High Speed Comparator Push-Pull" SOT23_8_TI 50.421,23.291 r90 top (schematic designator U7)
U7_2 "High Speed Comparator Push-Pull" SOT23_8_TI 37.721,23.291 r90 top (schematic designator U7)
U7_3 "High Speed Comparator Push-Pull" SOT23_8_TI 25.021,23.291 r90 top (schematic designator U7)
U7_4 "High Speed Comparator Push-Pull" SOT23_8_TI 12.364,23.303 r90 top (schematic designator U7)
U8_1 "High Speed Comparator Push-Pull" SOT23_8_TI 55.528,23.291 r90 top (schematic designator U8)
U8_2 "High Speed Comparator Push-Pull" SOT23_8_TI 42.828,23.291 r90 top (schematic designator U8)
U8_3 "High Speed Comparator Push-Pull" SOT23_8_TI 30.128,23.291 r90 top (schematic designator U8)
U8_4 "High Speed Comparator Push-Pull" SOT23_8_TI 17.471,23.303 r90 top (schematic designator U8)
U9_1 "4 Channel Super-Speed TVS diode" UFDFN10_TI 52.792,17.74 r90 top (schematic designator U9)
U9_2 "4 Channel Super-Speed TVS diode" UFDFN10_TI 40.092,17.74 r90 top (schematic designator U9)
U9_3 "4 Channel Super-Speed TVS diode" UFDFN10_TI 27.392,17.74 r90 top (schematic designator U9)
U9_4 "4 Channel Super-Speed TVS diode" UFDFN10_TI 14.735,17.752 r90 top (schematic designator U9)

## Footprints (in the part's own frame and the unit in brackets; to place one, negate y for a bottom-side part, rotate by r counter-clockwise, add the part's x,y. Pads: shape width x height; smd on the part's side, far side on the other; paste and mask are expansions set on the pad)
AMPHENOL_12402012E212A [mm]
  rect 0.6x1.14 smd: A1_B12(-3.2,4.75) A1_B12(3.2,4.75) A4_B4(-2.4,4.75) A4_B4(2.4,4.75)
  rect 0.3x1.14 smd: A5(-1.25,4.75) A6_B6(-0.25,4.75) A6_B6(0.75,4.75) A7_B7(-0.75,4.75) A7_B7(0.25,4.75) A8(1.25,4.75) B5(1.75,4.75) B8(-1.75,4.75)
  oval 1.05x2.1 hole 0.6 slot 1.7 at 90 deg: SH(-4.32,4.18) SH(4.32,4.18)
  oval 0.9x1.8 hole 0.6 slot 1.4 at 90 deg: SH(-4.32,0) SH(4.32,0)
  round 0.65 hole 0.65 unplated: ""(-2.89,3.68) ""(2.89,3.68)
  silkscreen extent -4.47,1.22 4.47,2.81, body extent -4.47,-2.52 4.47,5.08, height 3.28
"CAPC1607X09L - 0603" [mm] "Chip Capacitor 0603, 2-Leads, Body 1,55x0,80mm, IPC High Density"
  rect 0.75x1 smd: 1(-0.575,0) 2(0.575,0)
  silkscreen extent 0,-0.38 0,0.38, body extent -0.82,-0.45 0.82,0.45, height 0.9
LF_1812L010DR [mm]
  rect 1.78x3.15 smd: 1(-2.615,0) 2(2.615,0)
  silkscreen extent -4.1,-1.62 1.5,1.62, body extent -2.27,-1.63 2.27,1.63, height 1.95
LQFP64_FTDI [mm] "FTDI_LQFP, 64-Leads, Body 10,00x10,00mm, Pitch 0,50mm, IPC High Density"
  oval 1.25x0.25 smd mask+0: 1(-5.625,3.75) 2(-5.625,3.25) 3(-5.625,2.75) 4(-5.625,2.25) 5(-5.625,1.75) 6(-5.625,1.25) 7(-5.625,0.75) 8(-5.625,0.25) 9(-5.625,-0.25) 10(-5.625,-0.75) 11(-5.625,-1.25) 12(-5.625,-1.75) 13(-5.625,-2.25) 14(-5.625,-2.75) 15(-5.625,-3.25) 16(-5.625,-3.75) 33(5.625,-3.75) 34(5.625,-3.25) 35(5.625,-2.75) 36(5.625,-2.25) 37(5.625,-1.75) 38(5.625,-1.25) 39(5.625,-0.75) 40(5.625,-0.25) 41(5.625,0.25) 42(5.625,0.75) 43(5.625,1.25) 44(5.625,1.75) 45(5.625,2.25) 46(5.625,2.75) 47(5.625,3.25) 48(5.625,3.75)
  oval 0.25x1.25 smd mask+0: 17(-3.75,-5.625) 18(-3.25,-5.625) 19(-2.75,-5.625) 20(-2.25,-5.625) 21(-1.75,-5.625) 22(-1.25,-5.625) 23(-0.75,-5.625) 24(-0.25,-5.625) 25(0.25,-5.625) 26(0.75,-5.625) 27(1.25,-5.625) 28(1.75,-5.625) 29(2.25,-5.625) 30(2.75,-5.625) 31(3.25,-5.625) 32(3.75,-5.625) 49(3.75,5.625) 50(3.25,5.625) 51(2.75,5.625) 52(2.25,5.625) 53(1.75,5.625) 54(1.25,5.625) 55(0.75,5.625) 56(0.25,5.625) 57(-0.25,5.625) 58(-0.75,5.625) 59(-1.25,5.625) 60(-1.75,5.625) 61(-2.25,5.625) 62(-2.75,5.625) 63(-3.25,5.625) 64(-3.75,5.625)
  silkscreen extent -5.75,-4.6 4.6,4.6, body extent -6,-6 6,6, height 1.6
LQFP144_LATTICE [mm]
  oval 1.955x0.312 smd paste+0 mask+0: 1(-10.675,8.75)
  rrect100% 1.955x0.312 smd paste+0 mask+0: 2(-10.675,8.25) 3(-10.675,7.75) 4(-10.675,7.25) 5(-10.675,6.75) 6(-10.675,6.25) 7(-10.675,5.75) 8(-10.675,5.25) 9(-10.675,4.75) 10(-10.675,4.25) 11(-10.675,3.75) 12(-10.675,3.25) 13(-10.675,2.75) 14(-10.675,2.25) 15(-10.675,1.75) 16(-10.675,1.25) 17(-10.675,0.75) 18(-10.675,0.25) 19(-10.675,-0.25) 20(-10.675,-0.75) 21(-10.675,-1.25) 22(-10.675,-1.75) 23(-10.675,-2.25) 24(-10.675,-2.75) 25(-10.675,-3.25) 26(-10.675,-3.75) 27(-10.675,-4.25) 28(-10.675,-4.75) 29(-10.675,-5.25) 30(-10.675,-5.75) 31(-10.675,-6.25) 32(-10.675,-6.75) 33(-10.675,-7.25) 34(-10.675,-7.75) 35(-10.675,-8.25) 36(-10.675,-8.75) 73(10.675,-8.75) 74(10.675,-8.25) 75(10.675,-7.75) 76(10.675,-7.25) 77(10.675,-6.75) 78(10.675,-6.25) 79(10.675,-5.75) 80(10.675,-5.25) 81(10.675,-4.75) 82(10.675,-4.25) 83(10.675,-3.75) 84(10.675,-3.25) 85(10.675,-2.75) 86(10.675,-2.25) 87(10.675,-1.75) 88(10.675,-1.25) 89(10.675,-0.75) 90(10.675,-0.25) 91(10.675,0.25) 92(10.675,0.75) 93(10.675,1.25) 94(10.675,1.75) 95(10.675,2.25) 96(10.675,2.75) 97(10.675,3.25) 98(10.675,3.75) 99(10.675,4.25) 100(10.675,4.75) 101(10.675,5.25) 102(10.675,5.75) 103(10.675,6.25) 104(10.675,6.75) 105(10.675,7.25) 106(10.675,7.75) 107(10.675,8.25) 108(10.675,8.75)
  rrect100% 0.312x1.955 smd paste+0 mask+0: 37(-8.75,-10.675) 38(-8.25,-10.675) 39(-7.75,-10.675) 40(-7.25,-10.675) 41(-6.75,-10.675) 42(-6.25,-10.675) 43(-5.75,-10.675) 44(-5.25,-10.675) 45(-4.75,-10.675) 46(-4.25,-10.675) 47(-3.75,-10.675) 48(-3.25,-10.675) 49(-2.75,-10.675) 50(-2.25,-10.675) 51(-1.75,-10.675) 52(-1.25,-10.675) 53(-0.75,-10.675) 54(-0.25,-10.675) 55(0.25,-10.675) 56(0.75,-10.675) 57(1.25,-10.675) 58(1.75,-10.675) 59(2.25,-10.675) 60(2.75,-10.675) 61(3.25,-10.675) 62(3.75,-10.675) 63(4.25,-10.675) 64(4.75,-10.675) 65(5.25,-10.675) 66(5.75,-10.675) 67(6.25,-10.675) 68(6.75,-10.675) 69(7.25,-10.675) 70(7.75,-10.675) 71(8.25,-10.675) 72(8.75,-10.675) 109(8.75,10.675) 110(8.25,10.675) 111(7.75,10.675) 112(7.25,10.675) 113(6.75,10.675) 114(6.25,10.675) 115(5.75,10.675) 116(5.25,10.675) 117(4.75,10.675) 118(4.25,10.675) 119(3.75,10.675) 120(3.25,10.675) 121(2.75,10.675) 122(2.25,10.675) 123(1.75,10.675) 124(1.25,10.675) 125(0.75,10.675) 126(0.25,10.675) 127(-0.25,10.675) 128(-0.75,10.675) 129(-1.25,10.675) 130(-1.75,10.675) 131(-2.25,10.675) 132(-2.75,10.675) 133(-3.25,10.675) 134(-3.75,10.675) 135(-4.25,10.675) 136(-4.75,10.675) 137(-5.25,10.675) 138(-5.75,10.675) 139(-6.25,10.675) 140(-6.75,10.675) 141(-7.25,10.675) 142(-7.75,10.675) 143(-8.25,10.675) 144(-8.75,10.675)
  silkscreen extent -11.56,-9.25 9.25,9.8, body extent -11,-11 11,11, height 2
LQH32PB_N0-MFG [mm]
  rect 1.25x2 smd paste+0 mask+0: 1(-1.275,0) 2(1.275,0)
  silkscreen extent -1.75,-1.4 1.75,1.4, body extent -2,-1.5 2,1.5, height 0.25
M3_Mounting_Circular_Screw_L8mm [mm]
  round 5 hole 3.2: MT(0,0)
  body extent -2.72,-2.72 2.72,2.72, height 3
"muRata 0603 Ferrite Bead" [mm]
  rect 0.906x0.858 smd paste+0 mask+0: 1(-0.576,0) 2(0.576,0)
  body extent -0.8,-0.4 0.8,0.4, height 0.75
"RESC1508X05L - 0603" [mm] "Chip Resistor 0603, 2-Leads, Body 1,55x0,80mm, IPC High Density"
  rect 0.75x1 smd: 1(-0.575,0) 2(0.575,0)
  silkscreen extent 0,-0.38 0,0.38, body extent -0.85,-0.45 0.85,0.45, height 0.5
"SOD123 - Nexperia" [mm]
  rect 0.91x1.22 smd paste-1000 mask+0: 1(1.635,0) 2(-1.635,0)
  silkscreen extent -1.9,-0.85 0.8,1.14, body extent -2.29,-1.05 2.29,1.05, height 0.25
SON10_2.5x2.5_GEN [mm] "SON, 10-Leads, Body 2,50x2,50mm, Pitch 0,50mm, Thermal Pad 2,00x0,99mm, IPC Medium Density"
  rrect50% 0.9x0.25 smd: 1(-1.145,1) 2(-1.145,0.5) 3(-1.145,0) 4(-1.145,-0.5) 5(-1.145,-1) 6(1.145,-1) 7(1.145,-0.5) 8(1.145,0) 9(1.145,0.5) 10(1.145,1)
  rect 0.99x2 smd: 11(0,0)
  silkscreen extent -2.03,-1.45 1.3,1.65, body extent -1.35,-1.3 1.35,1.3, height 0.8
SOT23_8_TI [mm] "SOT23, 8-Leads, Texas Instruments"
  rrect50% 0.9x0.45 smd mask+0: 1(-1.2,0.983) 2(-1.2,0.333) 3(-1.2,-0.318) 4(-1.2,-0.968) 5(1.2,-0.968) 6(1.2,-0.317) 7(1.2,0.333) 8(1.2,0.983)
  silkscreen extent -1.32,-1.55 0.35,1.92, body extent -1.4,-1.45 1.4,1.45, height 1.45
SOT95P280X145-6N [mm]
  rect 1.2x0.6 smd: 1(-1.25,0.95) 2(-1.25,0) 3(-1.25,-0.95) 4(1.25,-0.95) 5(1.25,0) 6(1.25,0.95)
  silkscreen extent -1.75,-1.46 0.3,1.88, body extent -1.4,-1.46 1.4,1.46, height 1.45
SULLINS_PPPC202LJBN-RC [mm]
  rect 1.605x1.605 / inner round 1.605 / far side rect 1.605x1.605 hole 1.07: 1(-24.13,8.39)
  round 1.605 hole 1.07: 2(-24.13,5.85) 3(-21.59,8.39) 4(-21.59,5.85) 5(-19.05,8.39) 6(-19.05,5.85) 7(-16.51,8.39) 8(-16.51,5.85) 9(-13.97,8.39) 10(-13.97,5.85) 11(-11.43,8.39) 12(-11.43,5.85) 13(-8.89,8.39) 14(-8.89,5.85) 15(-6.35,8.39) 16(-6.35,5.85) 17(-3.81,8.39) 18(-3.81,5.85) 19(-1.27,8.39) 20(-1.27,5.85) 21(1.27,8.39) 22(1.27,5.85) 23(3.81,8.39) 24(3.81,5.85) 25(6.35,8.39) 26(6.35,5.85) 27(8.89,8.39) 28(8.89,5.85) 29(11.43,8.39) 30(11.43,5.85) 31(13.97,8.39) 32(13.97,5.85) 33(16.51,8.39) 34(16.51,5.85) 35(19.05,8.39) 36(19.05,5.85) 37(21.59,8.39) 38(21.59,5.85) 39(24.13,8.39) 40(24.13,5.85)
  silkscreen extent -25.65,-4.25 25.65,8.49, body extent -25.65,-4.27 25.65,8.59, height 5.08
TP_CIRC_SMD_1mm [mm] "1mm Test Pad Circular"
  round 1 smd paste-2539.97: 1(0,0)
TSSOP54_GEN [mm] "JEDEC Standard, TSOP, 54-Leads, Body 22,22x10,16mm, Pitch 0,80mm, IPC Medium Density"
  oval 1.2x0.5 smd: 1(-5.75,10.4) 2(-5.75,9.6) 3(-5.75,8.8) 4(-5.75,8) 5(-5.75,7.2) 6(-5.75,6.4) 7(-5.75,5.6) 8(-5.75,4.8) 9(-5.75,4) 10(-5.75,3.2) 11(-5.75,2.4) 12(-5.75,1.6) 13(-5.75,0.8) 14(-5.75,0) 15(-5.75,-0.8) 16(-5.75,-1.6) 17(-5.75,-2.4) 18(-5.75,-3.2) 19(-5.75,-4) 20(-5.75,-4.8) 21(-5.75,-5.6) 22(-5.75,-6.4) 23(-5.75,-7.2) 24(-5.75,-8) 25(-5.75,-8.8) 26(-5.75,-9.6) 27(-5.75,-10.4) 28(5.75,-10.4) 29(5.75,-9.6) 30(5.75,-8.8) 31(5.75,-8) 32(5.75,-7.2) 33(5.75,-6.4) 34(5.75,-5.6) 35(5.75,-4.8) 36(5.75,-4) 37(5.75,-3.2) 38(5.75,-2.4) 39(5.75,-1.6) 40(5.75,-0.8) 41(5.75,0) 42(5.75,0.8) 43(5.75,1.6) 44(5.75,2.4) 45(5.75,3.2) 46(5.75,4) 47(5.75,4.8) 48(5.75,5.6) 49(5.75,6.4) 50(5.75,7.2) 51(5.75,8) 52(5.75,8.8) 53(5.75,9.6) 54(5.75,10.4)
  silkscreen extent -5.87,-11.2 4.75,11.32, body extent -5.88,-11.2 5.88,11.2, height 1.2
UFDFN10_TI [mm]
  rrect50% 0.565x0.2 smd paste+0 mask+0: 1(-0.417,1) 2(-0.417,0.5) 4(-0.417,-0.5) 5(-0.417,-1) 6(0.417,-1) 7(0.417,-0.5) 9(0.417,0.5) 10(0.417,1)
  rrect25% 0.565x0.4 smd paste-1000 mask+0: 3(-0.417,0) 8(0.417,0)
  silkscreen extent -1.37,-1.48 0.55,1.48, body extent -0.5,-1.25 0.5,1.25, height 0.55